# Altium PCB ISC-nRF52840-A-MODULE-Position-1.PcbDoc
Units mm, origin at the board's own origin, x right, y up, seen from the top; angles counter-clockwise.
Board outline 34.04 x 20.95 mm, 2 copper layers (Top Layer, Bottom Layer); 1 components, 0 nets, 55 pads, 0 vias.
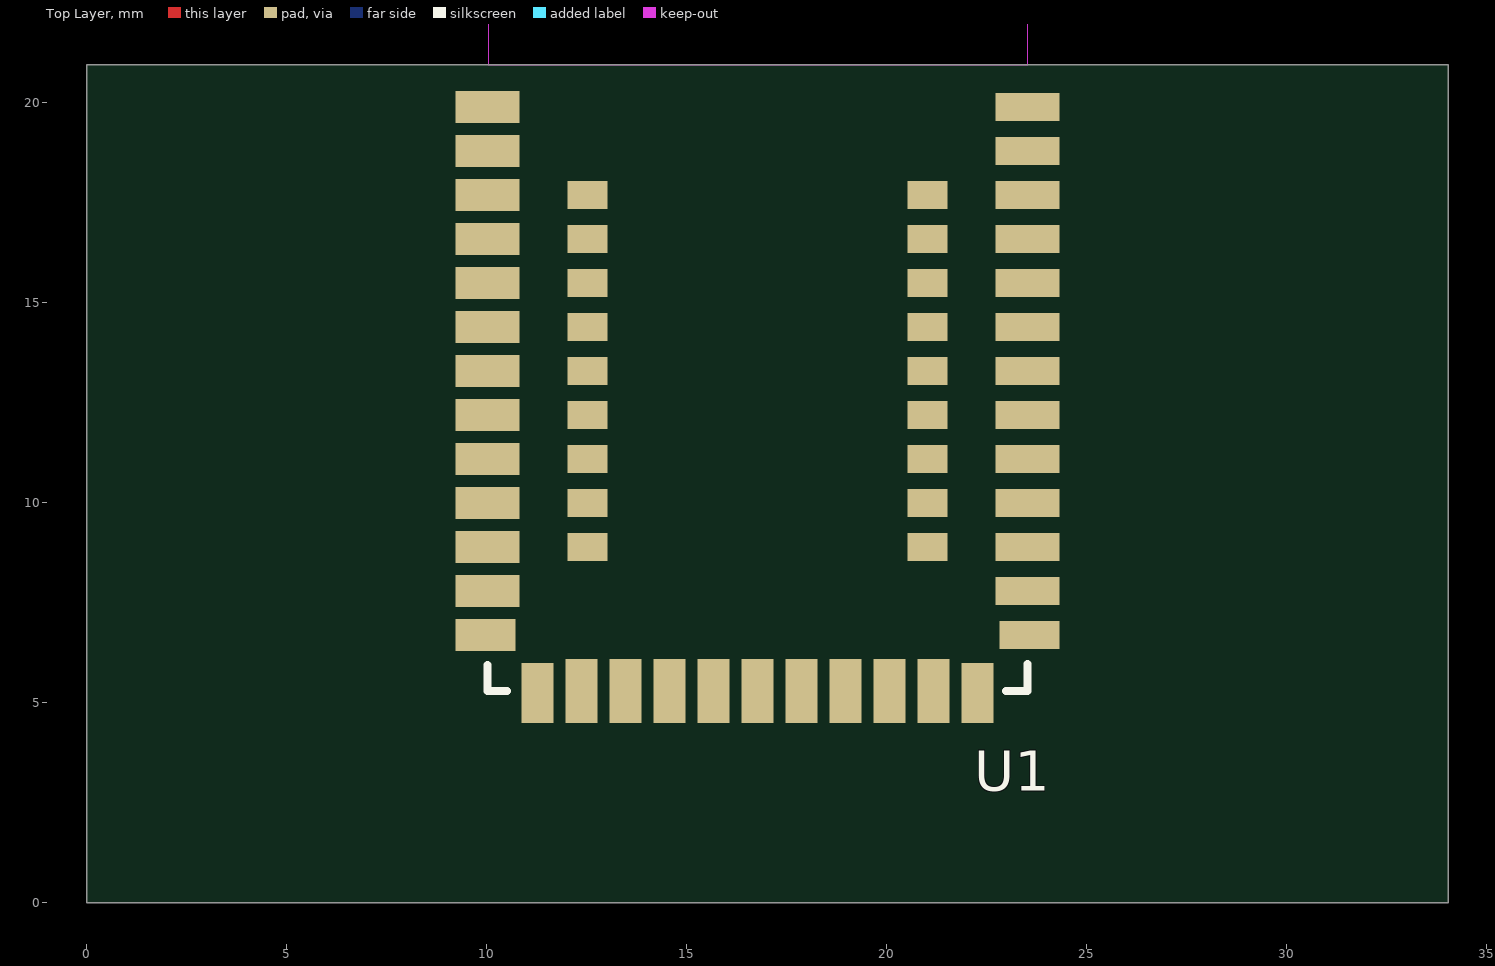
[diagram p0: Top Layer view]
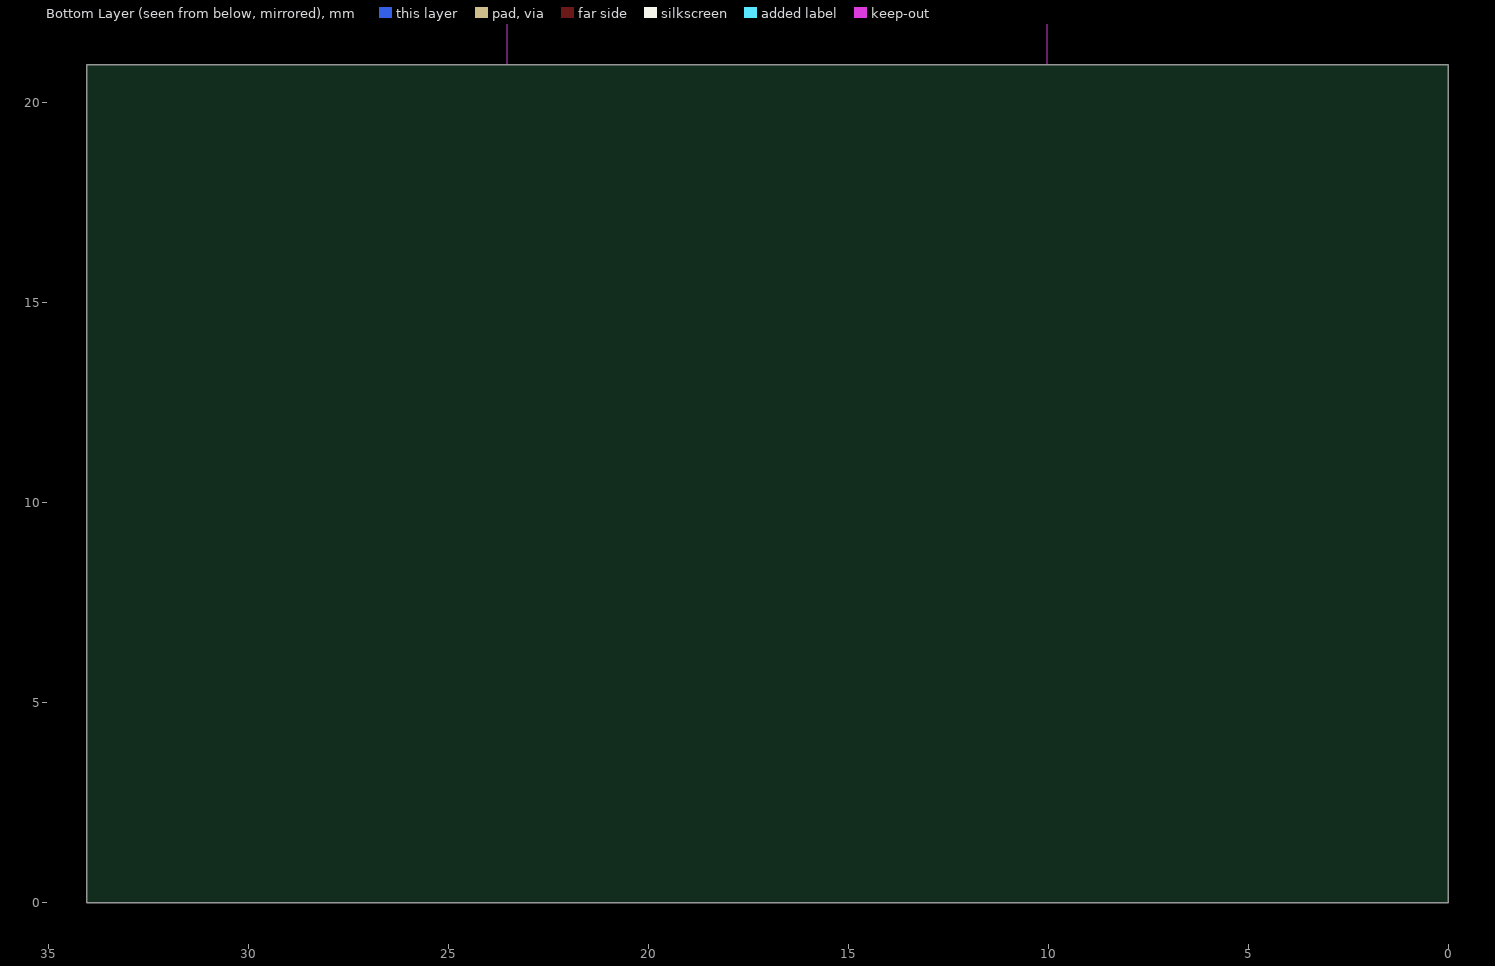
[diagram p1: Bottom Layer view, seen from below]

## Layer stack, top to bottom
Top Solder: solder mask 0.0102, Solder Resist, Dk 3.5
Top Layer: signal copper 0.0356
Dielectric 1: dielectric 0.32, FR-4, Dk 4.8
Bottom Layer: signal copper 0.0356
Bottom Solder: solder mask 0.0102, Solder Resist, Dk 3.5

## Board outline
0,0 34.036,0 34.036,20.955 0,20.955

## Design rules (kind name [scope] priority, off if disabled: settings)
Clearance [All] p1: gap=0.254 ignorepadtopadclearanceinfootprint=FALSE
PolygonConnect [All] p1: connectstyle=Relief reliefconductorwidth=0.254 reliefentries=4 polygonreliefangle="90 Angle" airgapwidth=0.254
RoutingVias [All] p1: holewidth=0.711 width=1.27 viastyle="Through Hole" minholewidth=0.711 minwidth=1.27 maxholewidth=0.711 maxwidth=1.27
SolderMaskExpansion [All] p1: expansion=0.102 istentingtop=FALSE
Width [All] p1: maxlimit=0.254 minlimit=0.254 preferedwidth=0.254
30 further rules are at their usual default settings.

## Components (designator, comment, footprint, x,y, rotation, side; value= is the part's Value field where it differs from the comment)
U1 "ISC-nRF52840-A" ISC-nRF52840-MODULE 16.764,12.573 r0 top

## Footprints (in the part's own frame and the unit in brackets; to place one, negate y for a bottom-side part, rotate by r counter-clockwise, add the part's x,y. Pads: shape width x height; smd on the part's side, far side on the other; paste and mask are expansions set on the pad)
ISC-nRF52840-MODULE [mm]
  rect 1.6x0.8 smd mask+0.05: 1(-6.75,7.325) 2(-6.75,6.225) 3(-6.75,5.125) 4(-6.75,4.025) 5(-6.75,2.925) 6(-6.75,1.825) 7(-6.75,0.725) 8(-6.75,-0.375) 9(-6.75,-1.475) 10(-6.75,-2.575) 11(-6.75,-3.675) 12(-6.75,-4.775)
  rect 1.5x0.8 smd mask+0.05: 13(-6.8,-5.875)
  rect 0.8x1.5 smd mask+0.05: 14(-5.5,-7.325) 24(5.5,-7.325)
  rect 0.8x1.6 smd mask+0.05: 15(-4.4,-7.275) 16(-3.3,-7.275) 17(-2.2,-7.275) 18(-1.1,-7.275) 19(0,-7.275) 20(1.1,-7.275) 21(2.2,-7.275) 22(3.3,-7.275) 23(4.4,-7.275)
  rect 1.5x0.7 smd mask+0.05: 25(6.8,-5.875)
  rect 1.6x0.7 smd mask+0.05: 26(6.75,-4.775) 27(6.75,-3.675) 28(6.75,-2.575) 29(6.75,-1.475) 30(6.75,-0.375) 31(6.75,0.725) 32(6.75,1.825) 33(6.75,2.925) 34(6.75,4.025) 35(6.75,5.125) 36(6.75,6.225) 37(6.75,7.325)
  rect 1x0.7 smd mask+0.05: 38(-4.25,5.125) 39(-4.25,4.025) 40(-4.25,2.925) 41(-4.25,1.825) 42(-4.25,0.725) 43(-4.25,-0.375) 44(-4.25,-1.475) 45(-4.25,-2.575) 46(-4.25,-3.675) 47(4.25,5.125) 48(4.25,4.025) 49(4.25,2.925) 50(4.25,1.825) 51(4.25,0.725) 52(4.25,-0.375) 53(4.25,-1.475) 54(4.25,-2.575) 55(4.25,-3.675)
  Keep-Out Layer region: -6.731,8.382 6.759,8.382 6.759,11.235 -6.731,11.235
  silkscreen extent -6.75,-7.27 6.75,-6.6, body extent -6.75,-7.38 6.75,11.12

## Part data
U1: library part ISC-nRF52840-A-MODULE

## Nets (pads, with @x,y where several pads share a name; then routed paths per layer and width w, separated by ;. In a path a pad name is that pad's centre, name@x,y a point inside that pad or via, vN(x,y) a via of type N, cw(c..) or ccw(c..) an arc to the next point about the centre after c; other vN are vias at no path point)
pads on no net: U1.1 U1.2 U1.3 U1.4 U1.5 U1.6 U1.7 U1.8 U1.9 U1.10 U1.11 U1.12 U1.13 U1.14 U1.15 U1.16 U1.17 U1.18 U1.19 U1.20 U1.21 U1.22 U1.23 U1.24 U1.25 U1.26 U1.27 U1.28 U1.29 U1.30 U1.31 U1.32 U1.33 U1.34 U1.35 U1.36 U1.37 U1.38 U1.39 U1.40 U1.41 U1.42 U1.43 U1.44 U1.45 U1.46 U1.47 U1.48 U1.49 U1.50 U1.51 U1.52 U1.53 U1.54 U1.55

## Other copper
Top Layer:
  text "NOTE: Antenna performance decreases if the position increases (e.g., position 1 gives higher performance)." at -0.152,-3.866 h2

## Silkscreen, mask and mechanical layers (free items; w line width, h text height)
Mechanical 1:
  the board outline again, w0.2
  text "↑Option 1. Placing at the edge with the antenna outside of the host board" at 0.051,-1.645 h1.52

## Text inside footprints (layer, text, board x,y; h text height)
U1: Mechanical 4 "ANTENNA" at 13.487,21.844 h1.4